# Altium PCB Pod_Islands_Panel.PcbDoc (part 6 of 10)
Units mm, origin at the board's own origin, x right, y up, seen from the top; angles counter-clockwise.
Board outline 95.7 x 83.7 mm, 6 copper layers (Top Layer, Inner1, Inner2, Inner3, Inner4, Bottom Layer), stack 0.82 mm thick; 1100 components, 940 nets, 4944 pads, 3680 vias.
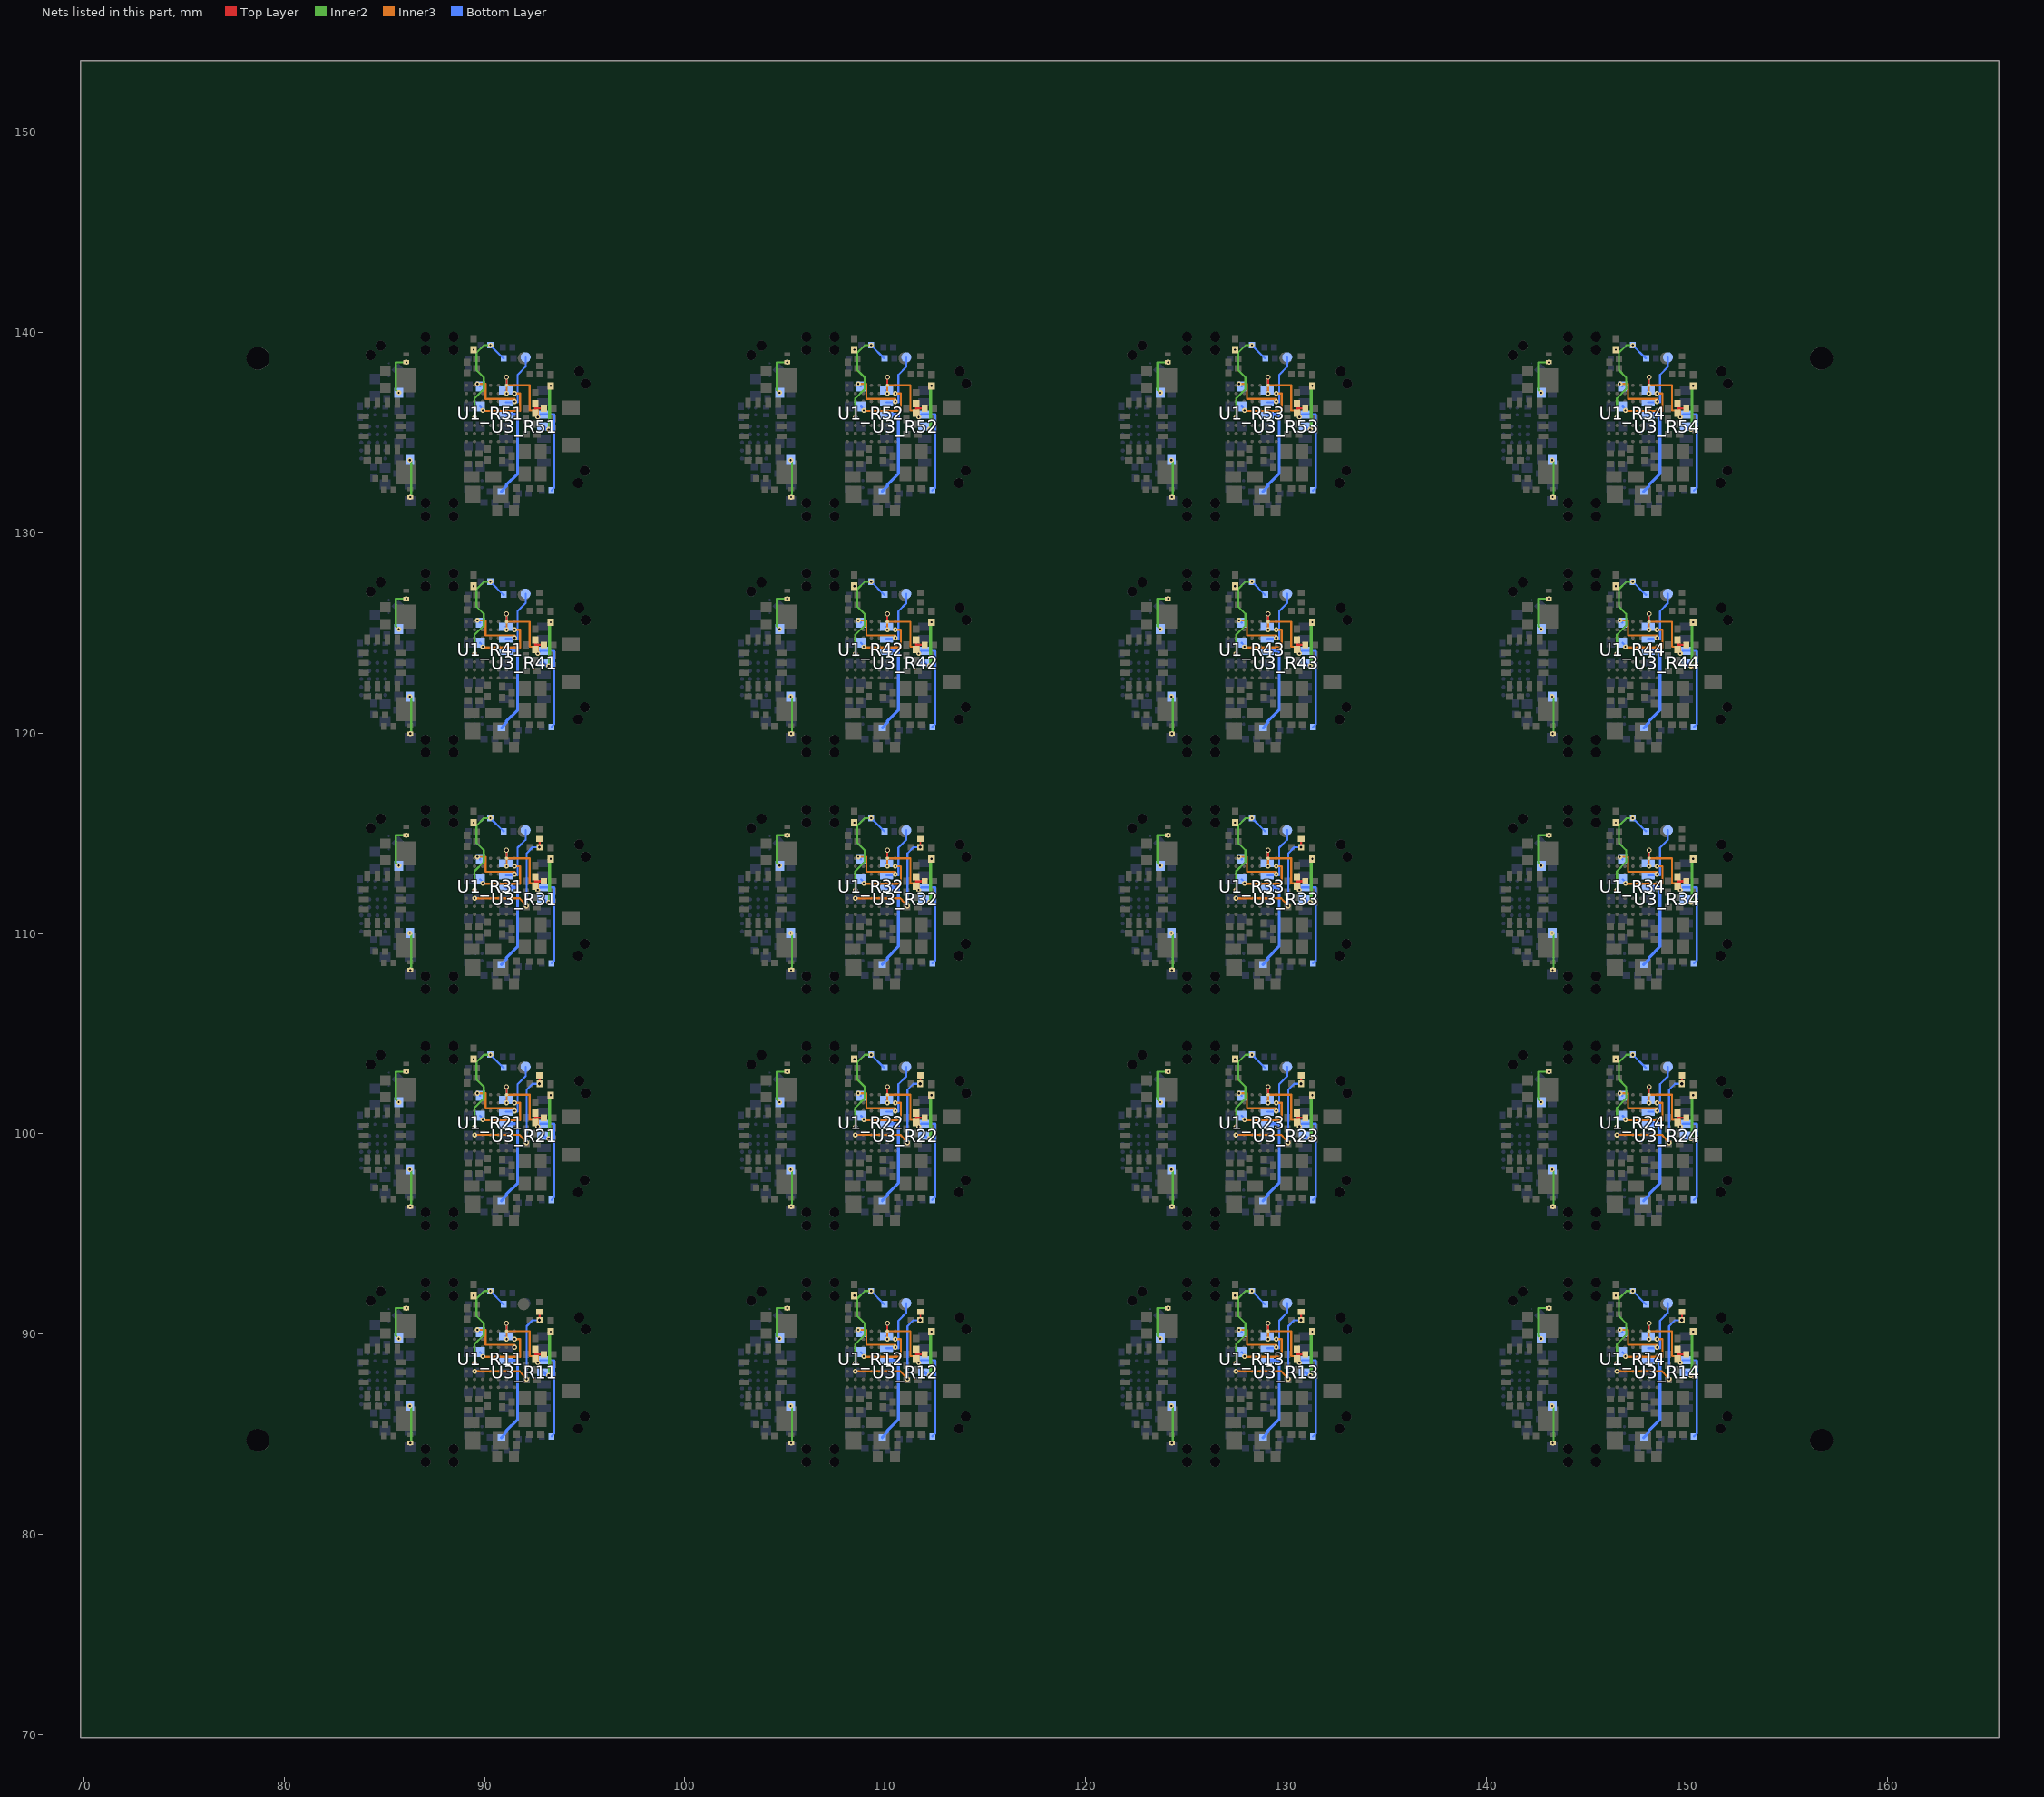
[diagram p10: the nets of this part, all layers, seen from the top]

## Via types
v1: diameter 0.249, hole 0.102, Top Layer to Inner1, 920 vias
v2: diameter 0.249, hole 0.102, Inner1 to Bottom Layer, 740 vias
v3: diameter 0.249, hole 0.102, Top Layer to Inner4, 580 vias
v4: diameter 0.249, hole 0.152, Top Layer to Bottom Layer, 540 vias
v5: diameter 0.249, hole 0.102, Inner4 to Bottom Layer, 520 vias
v6: diameter 0.3, hole 0.152, Inner1 to Inner4, 380 vias

## Nets (pads, with @x,y where several pads share a name; then routed paths per layer and width w, separated by ;. In a path a pad name is that pad's centre, name@x,y a point inside that pad or via, vN(x,y) a via of type N, cw(c..) or ccw(c..) an arc to the next point about the centre after c; other vN are vias at no path point) (continued)
PPG_GPIO_R12: pad.TP2@111.049,91.551 U3_R12.13 | length 3
  Bottom Layer w0.1: U3_R12.13@110.06,89.301 110.65,89.301 110.65,90.676 111.05,91.076 pad.TP2@111.05,91.551
PPG_GPIO_R13: pad.TP2@130.051,91.551 U3_R13.13 | length 3
  Bottom Layer w0.1: U3_R13.13@129.06,89.301 129.65,89.301 129.65,90.676 130.05,91.076 pad.TP2@130.051,91.551
PPG_GPIO_R14: pad.TP2@149.05,91.551 U3_R14.13 | length 3
  Bottom Layer w0.1: U3_R14.13@148.06,89.301 148.65,89.301 148.65,90.676 149.05,91.076 pad.TP2@149.05,91.551
PPG_GPIO_R21: pad.TP2@92.05,103.352 U3_R21.13 | length 3
  Bottom Layer w0.1: U3_R21.13@91.06,101.1 91.65,101.101 91.65,102.476 92.05,102.876 pad.TP2@92.05,103.351
PPG_GPIO_R22: pad.TP2@111.049,103.352 U3_R22.13 | length 3
  Bottom Layer w0.1: U3_R22.13@110.06,101.1 110.65,101.101 110.65,102.476 111.05,102.876 pad.TP2@111.05,103.351
PPG_GPIO_R23: pad.TP2@130.051,103.352 U3_R23.13 | length 3
  Bottom Layer w0.1: U3_R23.13@129.06,101.1 129.65,101.101 129.65,102.476 130.05,102.876 pad.TP2@130.05,103.351
PPG_GPIO_R24: pad.TP2@149.05,103.352 U3_R24.13 | length 3
  Bottom Layer w0.1: U3_R24.13@148.06,101.1 148.65,101.101 148.65,102.476 149.05,102.876 pad.TP2@149.05,103.351
PPG_GPIO_R31: pad.TP2@92.05,115.15 U3_R31.13 | length 3
  Bottom Layer w0.1: U3_R31.13@91.06,112.9 91.65,112.901 91.65,114.276 92.05,114.676 pad.TP2@92.05,115.15
PPG_GPIO_R32: pad.TP2@111.049,115.15 U3_R32.13 | length 3
  Bottom Layer w0.1: U3_R32.13@110.06,112.9 110.65,112.901 110.65,114.276 111.05,114.676 pad.TP2@111.05,115.151
PPG_GPIO_R33: pad.TP2@130.051,115.15 U3_R33.13 | length 3
  Bottom Layer w0.1: U3_R33.13@129.06,112.9 129.65,112.901 129.65,114.276 130.05,114.676 pad.TP2@130.051,115.15
PPG_GPIO_R34: pad.TP2@149.05,115.15 U3_R34.13 | length 3
  Bottom Layer w0.1: U3_R34.13@148.06,112.9 148.65,112.901 148.65,114.276 149.05,114.676 pad.TP2@149.05,115.15
PPG_GPIO_R41: pad.TP2@92.05,126.951 U3_R41.13 | length 3
  Bottom Layer w0.1: U3_R41.13@91.06,124.701 91.65,124.701 91.65,126.076 92.05,126.476 pad.TP2@92.05,126.951
PPG_GPIO_R42: pad.TP2@111.049,126.951 U3_R42.13 | length 3
  Bottom Layer w0.1: U3_R42.13@110.06,124.701 110.65,124.701 110.65,126.076 111.05,126.476 pad.TP2@111.05,126.951
PPG_GPIO_R43: pad.TP2@130.051,126.951 U3_R43.13 | length 3
  Bottom Layer w0.1: U3_R43.13@129.06,124.701 129.65,124.701 129.65,126.076 130.05,126.476 pad.TP2@130.051,126.951
PPG_GPIO_R44: pad.TP2@149.05,126.951 U3_R44.13 | length 3
  Bottom Layer w0.1: U3_R44.13@148.06,124.701 148.65,124.701 148.65,126.076 149.05,126.476 pad.TP2@149.05,126.951
PPG_GPIO_R51: pad.TP2@92.05,138.752 U3_R51.13 | length 3
  Bottom Layer w0.1: U3_R51.13@91.06,136.5 91.65,136.501 91.65,137.876 92.05,138.276 pad.TP2@92.05,138.751
PPG_GPIO_R52: pad.TP2@111.049,138.752 U3_R52.13 | length 3
  Bottom Layer w0.1: U3_R52.13@110.06,136.5 110.65,136.501 110.65,137.876 111.05,138.276 pad.TP2@111.05,138.751
PPG_GPIO_R53: pad.TP2@130.051,138.752 U3_R53.13 | length 3
  Bottom Layer w0.1: U3_R53.13@129.06,136.5 129.65,136.501 129.65,137.876 130.05,138.276 pad.TP2@130.05,138.751
PPG_GPIO_R54: pad.TP2@149.05,138.752 U3_R54.13 | length 3
  Bottom Layer w0.1: U3_R54.13@148.06,136.5 148.65,136.501 148.65,137.876 149.05,138.276 pad.TP2@149.05,138.751
PPG_INT_R11: U1_R11.H2 U3_R11.14 | length 1.1
  Top Layer w0.1: U1_R11.H2@91.1,90.15 v4(91.1,90.55)
  Bottom Layer w0.1: U3_R11.14@91.06,89.9 91.1,89.941 v4(91.1,90.55)
PPG_INT_R12: U1_R12.H2 U3_R12.14 | length 1.1
  Top Layer w0.1: U1_R12.H2@110.1,90.15 v4(110.1,90.55)
  Bottom Layer w0.1: U3_R12.14@110.06,89.9 110.1,89.941 v4(110.1,90.55)
PPG_INT_R13: U1_R13.H2 U3_R13.14 | length 1.1
  Top Layer w0.1: U1_R13.H2@129.1,90.15 v4(129.1,90.55)
  Bottom Layer w0.1: U3_R13.14@129.06,89.9 129.1,89.941 v4(129.1,90.55)
PPG_INT_R14: U1_R14.H2 U3_R14.14 | length 1.1
  Top Layer w0.1: U1_R14.H2@148.1,90.15 v4(148.1,90.55)
  Bottom Layer w0.1: U3_R14.14@148.06,89.9 148.1,89.941 v4(148.1,90.55)
PPG_INT_R21: U1_R21.H2 U3_R21.14 | length 1.1
  Top Layer w0.1: U1_R21.H2@91.1,101.949 v4(91.1,102.35)
  Bottom Layer w0.1: U3_R21.14@91.06,101.7 91.1,101.741 v4(91.1,102.35)
PPG_INT_R22: U1_R22.H2 U3_R22.14 | length 1.1
  Top Layer w0.1: U1_R22.H2@110.1,101.949 v4(110.1,102.35)
  Bottom Layer w0.1: U3_R22.14@110.06,101.7 110.1,101.741 v4(110.1,102.35)
PPG_INT_R23: U1_R23.H2 U3_R23.14 | length 1.1
  Top Layer w0.1: U1_R23.H2@129.1,101.949 v4(129.1,102.35)
  Bottom Layer w0.1: U3_R23.14@129.06,101.7 129.1,101.741 v4(129.1,102.35)
PPG_INT_R24: U1_R24.H2 U3_R24.14 | length 1.1
  Top Layer w0.1: U1_R24.H2@148.1,101.949 v4(148.1,102.35)
  Bottom Layer w0.1: U3_R24.14@148.06,101.7 148.1,101.741 v4(148.1,102.35)
PPG_INT_R31: U1_R31.H2 U3_R31.14 | length 1.1
  Top Layer w0.1: U1_R31.H2@91.1,113.75 v4(91.1,114.15)
  Bottom Layer w0.1: U3_R31.14@91.06,113.5 91.1,113.541 v4(91.1,114.15)
PPG_INT_R32: U1_R32.H2 U3_R32.14 | length 1.1
  Top Layer w0.1: U1_R32.H2@110.1,113.75 v4(110.1,114.15)
  Bottom Layer w0.1: U3_R32.14@110.06,113.5 110.1,113.541 v4(110.1,114.15)
PPG_INT_R33: U1_R33.H2 U3_R33.14 | length 1.1
  Top Layer w0.1: U1_R33.H2@129.1,113.75 v4(129.1,114.15)
  Bottom Layer w0.1: U3_R33.14@129.06,113.5 129.1,113.541 v4(129.1,114.15)
PPG_INT_R34: U1_R34.H2 U3_R34.14 | length 1.1
  Top Layer w0.1: U1_R34.H2@148.1,113.75 v4(148.1,114.15)
  Bottom Layer w0.1: U3_R34.14@148.06,113.5 148.1,113.541 v4(148.1,114.15)
PPG_INT_R41: U1_R41.H2 U3_R41.14 | length 1.1
  Top Layer w0.1: U1_R41.H2@91.1,125.55 v4(91.1,125.95)
  Bottom Layer w0.1: U3_R41.14@91.06,125.3 91.1,125.341 v4(91.1,125.95)
PPG_INT_R42: U1_R42.H2 U3_R42.14 | length 1.1
  Top Layer w0.1: U1_R42.H2@110.1,125.55 v4(110.1,125.95)
  Bottom Layer w0.1: U3_R42.14@110.06,125.3 110.1,125.341 v4(110.1,125.95)
PPG_INT_R43: U1_R43.H2 U3_R43.14 | length 1.1
  Top Layer w0.1: U1_R43.H2@129.1,125.55 v4(129.1,125.95)
  Bottom Layer w0.1: U3_R43.14@129.06,125.3 129.1,125.341 v4(129.1,125.95)
PPG_INT_R44: U1_R44.H2 U3_R44.14 | length 1.1
  Top Layer w0.1: U1_R44.H2@148.1,125.55 v4(148.1,125.95)
  Bottom Layer w0.1: U3_R44.14@148.06,125.3 148.1,125.341 v4(148.1,125.95)
PPG_INT_R51: U1_R51.H2 U3_R51.14 | length 1.1
  Top Layer w0.1: U1_R51.H2@91.1,137.349 v4(91.1,137.75)
  Bottom Layer w0.1: U3_R51.14@91.06,137.1 91.1,137.141 v4(91.1,137.75)
PPG_INT_R52: U1_R52.H2 U3_R52.14 | length 1.1
  Top Layer w0.1: U1_R52.H2@110.1,137.349 v4(110.1,137.75)
  Bottom Layer w0.1: U3_R52.14@110.06,137.1 110.1,137.141 v4(110.1,137.75)
PPG_INT_R53: U1_R53.H2 U3_R53.14 | length 1.1
  Top Layer w0.1: U1_R53.H2@129.1,137.349 v4(129.1,137.75)
  Bottom Layer w0.1: U3_R53.14@129.06,137.1 129.1,137.141 v4(129.1,137.75)
PPG_INT_R54: U1_R54.H2 U3_R54.14 | length 1.1
  Top Layer w0.1: U1_R54.H2@148.1,137.349 v4(148.1,137.75)
  Bottom Layer w0.1: U3_R54.14@148.06,137.1 148.1,137.141 v4(148.1,137.75)
PPG_LDO_EN_R11: R5_R11.1 U1_R11.G2 U3_R11.3 | length 8.3
  Inner3 w0.1: v3(91.1,89.75) 91.1,90.15 92.25,90.15 92.25,88.9 92.66,88.9 v2(92.66,88.57)
  Bottom Layer w0.1: v2(92.66,88.57) 92.791,88.701 92.959,88.701 93.48,88.701 93.48,85.041 R5_R11.1@93.34,84.901
PPG_LDO_EN_R12: R5_R12.1 U1_R12.G2 U3_R12.3 | length 8.3
  Inner3 w0.1: v3@110.1,89.75 110.1,90.15 111.25,90.15 111.25,88.9 111.66,88.9 v2(111.66,88.57)
  Bottom Layer w0.1: v2(111.66,88.57) 111.791,88.701 111.959,88.701 112.48,88.701 112.48,85.041 R5_R12.1@112.34,84.901
  other v3: 110.1,89.75
PPG_LDO_EN_R13: R5_R13.1 U1_R13.G2 U3_R13.3 | length 8.3
  Inner3 w0.1: v3(129.1,89.75) 129.1,90.15 130.25,90.15 130.25,88.9 130.66,88.9 v2(130.66,88.57)
  Bottom Layer w0.1: v2(130.66,88.57) 130.791,88.701 130.959,88.701 131.48,88.701 131.48,85.041 R5_R13.1@131.34,84.901
PPG_LDO_EN_R14: R5_R14.1 U1_R14.G2 U3_R14.3 | length 8.3
  Inner3 w0.1: v3(148.1,89.75) 148.1,90.15 149.25,90.15 149.25,88.9 149.66,88.9 v2(149.66,88.57)
  Bottom Layer w0.1: v2(149.66,88.57) 149.791,88.701 149.959,88.701 150.48,88.701 150.48,85.041 R5_R14.1@150.34,84.901
PPG_LDO_EN_R21: R5_R21.1 U1_R21.G2 U3_R21.3 | length 8.3
  Inner3 w0.1: v3(91.1,101.55) 91.1,101.95 92.25,101.95 92.25,100.7 92.66,100.7 v2(92.66,100.37)
  Bottom Layer w0.1: v2(92.66,100.37) 92.791,100.501 U3_R21.3@92.96,100.5 93.48,100.501 93.48,96.841 R5_R21.1@93.34,96.701
PPG_LDO_EN_R22: R5_R22.1 U1_R22.G2 U3_R22.3 | length 8.3
  Inner3 w0.1: v3@110.1,101.55 110.1,101.95 111.25,101.95 111.25,100.7 111.66,100.7 v2(111.66,100.37)
  Bottom Layer w0.1: v2(111.66,100.37) 111.791,100.501 U3_R22.3@111.96,100.5 112.48,100.501 112.48,96.841 R5_R22.1@112.342,96.7
  other v3: 110.1,101.55
PPG_LDO_EN_R23: R5_R23.1 U1_R23.G2 U3_R23.3 | length 8.3
  Inner3 w0.1: v3(129.1,101.55) 129.1,101.95 130.25,101.95 130.25,100.7 130.66,100.7 v2(130.66,100.37)
  Bottom Layer w0.1: v2(130.66,100.37) 130.791,100.501 U3_R23.3@130.96,100.5 131.48,100.501 131.48,96.841 R5_R23.1@131.342,96.7
PPG_LDO_EN_R24: R5_R24.1 U1_R24.G2 U3_R24.3 | length 8.3
  Inner3 w0.1: v3(148.1,101.55) 148.1,101.95 149.25,101.95 149.25,100.7 149.66,100.7 v2(149.66,100.37)
  Bottom Layer w0.1: v2(149.66,100.37) 149.791,100.501 U3_R24.3@149.96,100.5 150.48,100.501 150.48,96.841 R5_R24.1@150.34,96.701
PPG_LDO_EN_R31: R5_R31.1 U1_R31.G2 U3_R31.3 | length 8.3
  Inner3 w0.1: v3(91.1,113.35) 91.1,113.75 92.25,113.75 92.25,112.5 92.66,112.5 v2(92.66,112.17)
  Bottom Layer w0.1: v2(92.66,112.17) 92.791,112.301 U3_R31.3@92.96,112.3 93.48,112.301 93.48,108.641 R5_R31.1@93.34,108.501
PPG_LDO_EN_R32: R5_R32.1 U1_R32.G2 U3_R32.3 | length 8.3
  Inner3 w0.1: v3@110.1,113.35 110.1,113.75 111.25,113.75 111.25,112.5 111.66,112.5 v2(111.66,112.17)
  Bottom Layer w0.1: v2(111.66,112.17) 111.791,112.301 U3_R32.3@111.96,112.3 112.48,112.301 112.48,108.641 R5_R32.1@112.342,108.5
  other v3: 110.1,113.35
PPG_LDO_EN_R33: R5_R33.1 U1_R33.G2 U3_R33.3 | length 8.3
  Inner3 w0.1: v3(129.1,113.35) 129.1,113.75 130.25,113.75 130.25,112.5 130.66,112.5 v2(130.66,112.17)
  Bottom Layer w0.1: v2(130.66,112.17) 130.791,112.301 U3_R33.3@130.96,112.3 131.48,112.301 131.48,108.641 R5_R33.1@131.342,108.5
PPG_LDO_EN_R34: R5_R34.1 U1_R34.G2 U3_R34.3 | length 8.3
  Inner3 w0.1: v3(148.1,113.35) 148.1,113.75 149.25,113.75 149.25,112.5 149.66,112.5 v2(149.66,112.17)
  Bottom Layer w0.1: v2(149.66,112.17) 149.791,112.301 U3_R34.3@149.96,112.3 150.48,112.301 150.48,108.641 R5_R34.1@150.34,108.501
PPG_LDO_EN_R41: R5_R41.1 U1_R41.G2 U3_R41.3 | length 8.3
  Inner3 w0.1: v3(91.1,125.15) 91.1,125.55 92.25,125.55 92.25,124.3 92.66,124.3 v2(92.66,123.97)
  Bottom Layer w0.1: v2(92.66,123.97) 92.791,124.101 92.959,124.101 93.48,124.101 93.48,120.441 R5_R41.1@93.34,120.301
PPG_LDO_EN_R42: R5_R42.1 U1_R42.G2 U3_R42.3 | length 8.3
  Inner3 w0.1: v3@110.1,125.15 110.1,125.55 111.25,125.55 111.25,124.3 111.66,124.3 v2(111.66,123.97)
  Bottom Layer w0.1: v2(111.66,123.97) 111.791,124.101 111.959,124.101 112.48,124.101 112.48,120.441 R5_R42.1@112.34,120.301
  other v3: 110.1,125.15
PPG_LDO_EN_R43: R5_R43.1 U1_R43.G2 U3_R43.3 | length 8.3
  Inner3 w0.1: v3(129.1,125.15) 129.1,125.55 130.25,125.55 130.25,124.3 130.66,124.3 v2(130.66,123.97)
  Bottom Layer w0.1: v2(130.66,123.97) 130.791,124.101 130.959,124.101 131.48,124.101 131.48,120.441 R5_R43.1@131.34,120.301
PPG_LDO_EN_R44: R5_R44.1 U1_R44.G2 U3_R44.3 | length 8.3
  Inner3 w0.1: v3(148.1,125.15) 148.1,125.55 149.25,125.55 149.25,124.3 149.66,124.3 v2(149.66,123.97)
  Bottom Layer w0.1: v2(149.66,123.97) 149.791,124.101 149.959,124.101 150.48,124.101 150.48,120.441 R5_R44.1@150.34,120.301
PPG_LDO_EN_R51: R5_R51.1 U1_R51.G2 U3_R51.3 | length 8.3
  Inner3 w0.1: v3(91.1,136.95) 91.1,137.35 92.25,137.35 92.25,136.1 92.66,136.1 v2(92.66,135.77)
  Bottom Layer w0.1: v2(92.66,135.77) 92.791,135.901 U3_R51.3@92.96,135.9 93.48,135.901 93.48,132.241 R5_R51.1@93.34,132.101
PPG_LDO_EN_R52: R5_R52.1 U1_R52.G2 U3_R52.3 | length 8.3
  Inner3 w0.1: v3@110.1,136.95 110.1,137.35 111.25,137.35 111.25,136.1 111.66,136.1 v2(111.66,135.77)
  Bottom Layer w0.1: v2(111.66,135.77) 111.791,135.901 U3_R52.3@111.96,135.9 112.48,135.901 112.48,132.241 R5_R52.1@112.342,132.1
  other v3: 110.1,136.95
PPG_LDO_EN_R53: R5_R53.1 U1_R53.G2 U3_R53.3 | length 8.3
  Inner3 w0.1: v3(129.1,136.95) 129.1,137.35 130.25,137.35 130.25,136.1 130.66,136.1 v2(130.66,135.77)
  Bottom Layer w0.1: v2(130.66,135.77) 130.791,135.901 U3_R53.3@130.96,135.9 131.48,135.901 131.48,132.241 R5_R53.1@131.342,132.1
PPG_LDO_EN_R54: R5_R54.1 U1_R54.G2 U3_R54.3 | length 8.3
  Inner3 w0.1: v3(148.1,136.95) 148.1,137.35 149.25,137.35 149.25,136.1 149.66,136.1 v2(149.66,135.77)
  Bottom Layer w0.1: v2(149.66,135.77) 149.791,135.901 U3_R54.3@149.96,135.9 150.48,135.901 150.48,132.241 R5_R54.1@150.34,132.101
PPG_VLDO_R11: C31_R11.1 U3_R11.4 | length 2.5
  Inner2 w0.15: v2(93.2,87.949) 93.25,87.999 93.25,90.076 v3(93.3,90.126)
  Bottom Layer w0.15: U3_R11.4@92.96,88.1 93.109,87.949 v2(93.2,87.949)
PPG_VLDO_R12: C31_R12.1 U3_R12.4 | length 2.5
  Inner2 w0.15: v2(112.2,87.949) 112.25,87.999 112.25,90.076 v3(112.3,90.126)
  Bottom Layer w0.15: U3_R12.4@111.96,88.1 112.109,87.949 v2(112.2,87.949)
PPG_VLDO_R13: C31_R13.1 U3_R13.4 | length 2.5
  Inner2 w0.15: v2(131.2,87.949) 131.25,87.999 131.25,90.076 v3(131.3,90.126)
  Bottom Layer w0.15: U3_R13.4@130.96,88.1 131.109,87.949 v2(131.2,87.949)
PPG_VLDO_R14: C31_R14.1 U3_R14.4 | length 2.5
  Inner2 w0.15: v2(150.2,87.949) 150.25,87.999 150.25,90.076 v3(150.3,90.126)
  Bottom Layer w0.15: U3_R14.4@149.96,88.1 150.109,87.949 v2(150.2,87.949)
PPG_VLDO_R21: C31_R21.1 U3_R21.4 | length 2.5
  Inner2 w0.15: v2(93.2,99.749) 93.25,99.799 93.25,101.876 v3(93.3,101.926)
  Bottom Layer w0.15: U3_R21.4@92.959,99.899 93.109,99.749 v2(93.2,99.749)
PPG_VLDO_R22: C31_R22.1 U3_R22.4 | length 2.5
  Inner2 w0.15: v2(112.2,99.749) 112.25,99.799 112.25,101.876 v3(112.3,101.926)
  Bottom Layer w0.15: U3_R22.4@111.959,99.899 112.109,99.749 v2(112.2,99.749)
PPG_VLDO_R23: C31_R23.1 U3_R23.4 | length 2.5
  Inner2 w0.15: v2(131.2,99.749) 131.25,99.799 131.25,101.876 v3(131.3,101.926)
  Bottom Layer w0.15: U3_R23.4@130.959,99.899 131.109,99.749 v2(131.2,99.749)
PPG_VLDO_R24: C31_R24.1 U3_R24.4 | length 2.5
  Inner2 w0.15: v2(150.2,99.749) 150.25,99.799 150.25,101.876 v3(150.3,101.926)
  Bottom Layer w0.15: U3_R24.4@149.959,99.899 150.109,99.749 v2(150.2,99.749)
PPG_VLDO_R31: C31_R31.1 U3_R31.4 | length 2.5
  Inner2 w0.15: v2(93.2,111.549) 93.25,111.599 93.25,113.676 v3(93.3,113.726)
  Bottom Layer w0.15: U3_R31.4@92.96,111.7 93.109,111.549 v2(93.2,111.549)
PPG_VLDO_R32: C31_R32.1 U3_R32.4 | length 2.5
  Inner2 w0.15: v2(112.2,111.549) 112.25,111.599 112.25,113.676 v3(112.3,113.726)
  Bottom Layer w0.15: U3_R32.4@111.96,111.7 112.109,111.549 v2(112.2,111.549)
PPG_VLDO_R33: C31_R33.1 U3_R33.4 | length 2.5
  Inner2 w0.15: v2(131.2,111.549) 131.25,111.599 131.25,113.676 v3(131.3,113.726)
  Bottom Layer w0.15: U3_R33.4@130.96,111.7 131.109,111.549 v2(131.2,111.549)
PPG_VLDO_R34: C31_R34.1 U3_R34.4 | length 2.5
  Inner2 w0.15: v2(150.2,111.549) 150.25,111.599 150.25,113.676 v3(150.3,113.726)
  Bottom Layer w0.15: U3_R34.4@149.96,111.7 150.109,111.549 v2(150.2,111.549)
PPG_VLDO_R41: C31_R41.1 U3_R41.4 | length 2.5
  Inner2 w0.15: v2(93.2,123.349) 93.25,123.399 93.25,125.476 v3(93.3,125.526)
  Bottom Layer w0.15: U3_R41.4@92.96,123.5 93.109,123.349 v2(93.2,123.349)
PPG_VLDO_R42: C31_R42.1 U3_R42.4 | length 2.5
  Inner2 w0.15: v2(112.2,123.349) 112.25,123.399 112.25,125.476 v3(112.3,125.526)
  Bottom Layer w0.15: U3_R42.4@111.96,123.5 112.109,123.349 v2(112.2,123.349)
PPG_VLDO_R43: C31_R43.1 U3_R43.4 | length 2.5
  Inner2 w0.15: v2(131.2,123.349) 131.25,123.399 131.25,125.476 v3(131.3,125.526)
  Bottom Layer w0.15: U3_R43.4@130.96,123.5 131.109,123.349 v2(131.2,123.349)
PPG_VLDO_R44: C31_R44.1 U3_R44.4 | length 2.5
  Inner2 w0.15: v2(150.2,123.349) 150.25,123.399 150.25,125.476 v3(150.3,125.526)
  Bottom Layer w0.15: U3_R44.4@149.96,123.5 150.109,123.349 v2(150.2,123.349)
PPG_VLDO_R51: C31_R51.1 U3_R51.4 | length 2.5
  Inner2 w0.15: v2(93.2,135.149) 93.25,135.199 93.25,137.276 v3(93.3,137.326)
  Bottom Layer w0.15: U3_R51.4@92.959,135.299 93.109,135.149 v2(93.2,135.149)
PPG_VLDO_R52: C31_R52.1 U3_R52.4 | length 2.5
  Inner2 w0.15: v2(112.2,135.149) 112.25,135.199 112.25,137.276 v3(112.3,137.326)
  Bottom Layer w0.15: U3_R52.4@111.959,135.299 112.109,135.149 v2(112.2,135.149)
PPG_VLDO_R53: C31_R53.1 U3_R53.4 | length 2.5
  Inner2 w0.15: v2(131.2,135.149) 131.25,135.199 131.25,137.276 v3(131.3,137.326)
  Bottom Layer w0.15: U3_R53.4@130.959,135.299 131.109,135.149 v2(131.2,135.149)
PPG_VLDO_R54: C31_R54.1 U3_R54.4 | length 2.5
  Inner2 w0.15: v2(150.2,135.149) 150.25,135.199 150.25,137.276 v3(150.3,137.326)
  Bottom Layer w0.15: U3_R54.4@149.959,135.299 150.109,135.149 v2(150.2,135.149)
PPG_VREF_R11: C32_R11.1 U3_R11.12 | length 4.8
  Bottom Layer w0.15: C32_R11.1@90.844,84.85 91.1,85.127 91.1,85.2 91.65,85.75 91.65,88.701 U3_R11.12@91.06,88.701
PPG_VREF_R12: C32_R12.1 U3_R12.12 | length 4.8
  Bottom Layer w0.15: C32_R12.1@109.843,84.85 110.1,85.127 110.1,85.2 110.65,85.75 110.65,88.701 U3_R12.12@110.06,88.701
PPG_VREF_R13: C32_R13.1 U3_R13.12 | length 4.8
  Bottom Layer w0.15: C32_R13.1@128.844,84.85 129.1,85.127 129.1,85.2 129.65,85.75 129.65,88.701 U3_R13.12@129.06,88.701
PPG_VREF_R14: C32_R14.1 U3_R14.12 | length 4.8
  Bottom Layer w0.15: C32_R14.1@147.844,84.85 148.1,85.127 148.1,85.2 148.65,85.75 148.65,88.701 U3_R14.12@148.06,88.701
PPG_VREF_R21: C32_R21.1 U3_R21.12 | length 4.8
  Bottom Layer w0.15: C32_R21.1@90.844,96.65 91.1,96.927 91.1,97 91.65,97.55 91.65,100.501 U3_R21.12@91.06,100.5
PPG_VREF_R22: C32_R22.1 U3_R22.12 | length 4.8
  Bottom Layer w0.15: C32_R22.1@109.843,96.65 110.1,96.927 110.1,97 110.65,97.55 110.65,100.501 U3_R22.12@110.06,100.5
PPG_VREF_R23: C32_R23.1 U3_R23.12 | length 4.8
  Bottom Layer w0.15: C32_R23.1@128.844,96.65 129.1,96.927 129.1,97 129.65,97.55 129.65,100.501 U3_R23.12@129.06,100.5
PPG_VREF_R24: C32_R24.1 U3_R24.12 | length 4.8
  Bottom Layer w0.15: C32_R24.1@147.844,96.65 148.1,96.927 148.1,97 148.65,97.55 148.65,100.501 U3_R24.12@148.06,100.5
PPG_VREF_R31: C32_R31.1 U3_R31.12 | length 4.8
  Bottom Layer w0.15: C32_R31.1@90.844,108.45 91.1,108.727 91.1,108.8 91.65,109.35 91.65,112.301 U3_R31.12@91.06,112.3
PPG_VREF_R32: C32_R32.1 U3_R32.12 | length 4.8
  Bottom Layer w0.15: C32_R32.1@109.843,108.45 110.1,108.727 110.1,108.8 110.65,109.35 110.65,112.301 U3_R32.12@110.06,112.3
PPG_VREF_R33: C32_R33.1 U3_R33.12 | length 4.8
  Bottom Layer w0.15: C32_R33.1@128.844,108.45 129.1,108.727 129.1,108.8 129.65,109.35 129.65,112.301 U3_R33.12@129.06,112.3
PPG_VREF_R34: C32_R34.1 U3_R34.12 | length 4.8
  Bottom Layer w0.15: C32_R34.1@147.844,108.45 148.1,108.727 148.1,108.8 148.65,109.35 148.65,112.301 U3_R34.12@148.06,112.3
PPG_VREF_R41: C32_R41.1 U3_R41.12 | length 4.8
  Bottom Layer w0.15: C32_R41.1@90.844,120.25 91.1,120.527 91.1,120.6 91.65,121.15 91.65,124.101 U3_R41.12@91.06,124.101
PPG_VREF_R42: C32_R42.1 U3_R42.12 | length 4.8
  Bottom Layer w0.15: C32_R42.1@109.843,120.25 110.1,120.527 110.1,120.6 110.65,121.15 110.65,124.101 U3_R42.12@110.06,124.101
PPG_VREF_R43: C32_R43.1 U3_R43.12 | length 4.8
  Bottom Layer w0.15: C32_R43.1@128.844,120.25 129.1,120.527 129.1,120.6 129.65,121.15 129.65,124.101 U3_R43.12@129.06,124.101
PPG_VREF_R44: C32_R44.1 U3_R44.12 | length 4.8
  Bottom Layer w0.15: C32_R44.1@147.844,120.25 148.1,120.527 148.1,120.6 148.65,121.15 148.65,124.101 U3_R44.12@148.06,124.101
PPG_VREF_R51: C32_R51.1 U3_R51.12 | length 4.8
  Bottom Layer w0.15: C32_R51.1@90.844,132.05 91.1,132.327 91.1,132.4 91.65,132.95 91.65,135.901 U3_R51.12@91.06,135.9
PPG_VREF_R52: C32_R52.1 U3_R52.12 | length 4.8
  Bottom Layer w0.15: C32_R52.1@109.843,132.05 110.1,132.327 110.1,132.4 110.65,132.95 110.65,135.901 U3_R52.12@110.06,135.9
PPG_VREF_R53: C32_R53.1 U3_R53.12 | length 4.8
  Bottom Layer w0.15: C32_R53.1@128.844,132.05 129.1,132.327 129.1,132.4 129.65,132.95 129.65,135.901 U3_R53.12@129.06,135.9
PPG_VREF_R54: C32_R54.1 U3_R54.12 | length 4.8
  Bottom Layer w0.15: C32_R54.1@147.844,132.05 148.1,132.327 148.1,132.4 148.65,132.95 148.65,135.901 U3_R54.12@148.06,135.9
RF_50R_R11: C42_R11.1 L3_R11.2 Z41_R11.1 | length 0.9
  Top Layer w0.124: L3_R11.2@92.53,88.762 92.53,89.001 ; C42_R11.1@92.53,89.237 92.53,89.001 ; Z41_R11.1@92.959,89.001 92.53,89.001
RF_50R_R12: C42_R12.1 L3_R12.2 Z41_R12.1 | length 0.9
  Top Layer w0.124: L3_R12.2@111.53,88.762 111.53,89.001 ; C42_R12.1@111.53,89.237 111.53,89.001 ; Z41_R12.1@111.959,89.001 111.53,89.001
RF_50R_R13: C42_R13.1 L3_R13.2 Z41_R13.1 | length 0.9
  Top Layer w0.124: L3_R13.2@130.53,88.762 130.53,89.001 ; C42_R13.1@130.53,89.237 130.53,89.001 ; Z41_R13.1@130.959,89.001 130.53,89.001
RF_50R_R14: C42_R14.1 L3_R14.2 Z41_R14.1 | length 0.9
  Top Layer w0.124: L3_R14.2@149.53,88.762 149.53,89.001 ; C42_R14.1@149.53,89.237 149.53,89.001 ; Z41_R14.1@149.959,89.001 149.53,89.001
RF_50R_R21: C42_R21.1 L3_R21.2 Z41_R21.1 | length 0.9
  Top Layer w0.124: L3_R21.2@92.53,100.562 92.53,100.801 ; C42_R21.1@92.53,101.037 92.53,100.801 ; Z41_R21.1@92.958,100.8 92.53,100.801
RF_50R_R22: C42_R22.1 L3_R22.2 Z41_R22.1 | length 0.9
  Top Layer w0.124: L3_R22.2@111.53,100.562 111.53,100.801 ; C42_R22.1@111.53,101.037 111.53,100.801 ; Z41_R22.1@111.959,100.801 111.53,100.801
RF_50R_R23: C42_R23.1 L3_R23.2 Z41_R23.1 | length 0.9
  Top Layer w0.124: L3_R23.2@130.53,100.562 130.53,100.801 ; C42_R23.1@130.53,101.037 130.53,100.801 ; Z41_R23.1@130.959,100.801 130.53,100.801
RF_50R_R24: C42_R24.1 L3_R24.2 Z41_R24.1 | length 0.9
  Top Layer w0.124: L3_R24.2@149.53,100.562 149.53,100.801 ; C42_R24.1@149.53,101.037 149.53,100.801 ; Z41_R24.1@149.958,100.8 149.53,100.801
RF_50R_R31: C42_R31.1 L3_R31.2 Z41_R31.1 | length 0.9
  Top Layer w0.124: L3_R31.2@92.53,112.362 92.53,112.601 ; C42_R31.1@92.53,112.837 92.53,112.601 ; Z41_R31.1@92.958,112.6 92.53,112.601
RF_50R_R32: C42_R32.1 L3_R32.2 Z41_R32.1 | length 0.9
  Top Layer w0.124: L3_R32.2@111.53,112.362 111.53,112.601 ; C42_R32.1@111.53,112.837 111.53,112.601 ; Z41_R32.1@111.959,112.601 111.53,112.601
RF_50R_R33: C42_R33.1 L3_R33.2 Z41_R33.1 | length 0.9
  Top Layer w0.124: L3_R33.2@130.53,112.362 130.53,112.601 ; C42_R33.1@130.53,112.837 130.53,112.601 ; Z41_R33.1@130.959,112.601 130.53,112.601
RF_50R_R34: C42_R34.1 L3_R34.2 Z41_R34.1 | length 0.9
  Top Layer w0.124: L3_R34.2@149.53,112.362 149.53,112.601 ; C42_R34.1@149.53,112.837 149.53,112.601 ; Z41_R34.1@149.958,112.6 149.53,112.601
RF_50R_R41: C42_R41.1 L3_R41.2 Z41_R41.1 | length 0.9
  Top Layer w0.124: L3_R41.2@92.53,124.162 92.53,124.401 ; C42_R41.1@92.53,124.637 92.53,124.401 ; Z41_R41.1@92.959,124.401 92.53,124.401
RF_50R_R42: C42_R42.1 L3_R42.2 Z41_R42.1 | length 0.9
  Top Layer w0.124: L3_R42.2@111.53,124.162 111.53,124.401 ; C42_R42.1@111.53,124.637 111.53,124.401 ; Z41_R42.1@111.959,124.401 111.53,124.401
RF_50R_R43: C42_R43.1 L3_R43.2 Z41_R43.1 | length 0.9
  Top Layer w0.124: L3_R43.2@130.53,124.162 130.53,124.401 ; C42_R43.1@130.53,124.637 130.53,124.401 ; Z41_R43.1@130.959,124.401 130.53,124.401
RF_50R_R44: C42_R44.1 L3_R44.2 Z41_R44.1 | length 0.9
  Top Layer w0.124: L3_R44.2@149.53,124.162 149.53,124.401 ; C42_R44.1@149.53,124.637 149.53,124.401 ; Z41_R44.1@149.959,124.401 149.53,124.401
RF_50R_R51: C42_R51.1 L3_R51.2 Z41_R51.1 | length 0.9
  Top Layer w0.124: L3_R51.2@92.53,135.962 92.53,136.201 ; C42_R51.1@92.53,136.437 92.53,136.201 ; Z41_R51.1@92.958,136.2 92.53,136.201
RF_50R_R52: C42_R52.1 L3_R52.2 Z41_R52.1 | length 0.9
  Top Layer w0.124: L3_R52.2@111.53,135.962 111.53,136.201 ; C42_R52.1@111.53,136.437 111.53,136.201 ; Z41_R52.1@111.959,136.201 111.53,136.201
RF_50R_R53: C42_R53.1 L3_R53.2 Z41_R53.1 | length 0.9
  Top Layer w0.124: L3_R53.2@130.53,135.962 130.53,136.201 ; C42_R53.1@130.53,136.437 130.53,136.201 ; Z41_R53.1@130.959,136.201 130.53,136.201
RF_50R_R54: C42_R54.1 L3_R54.2 Z41_R54.1 | length 0.9
  Top Layer w0.124: L3_R54.2@149.53,135.962 149.53,136.201 ; C42_R54.1@149.53,136.437 149.53,136.201 ; Z41_R54.1@149.958,136.2 149.53,136.201
SWDCLK_P11: D13_P11.1 pad.JP10@85.723,89.781 | length 2.1
  Inner2 w0.1: v2(85.724,89.781) 85.575,89.929 85.575,91.3 v3(86.1,91.3)
SWDCLK_P12: D13_P12.1 pad.JP10@104.725,89.781 | length 2.1
  Inner2 w0.1: v2(104.724,89.781) 104.575,89.929 104.575,91.3 v3(105.1,91.3)
SWDCLK_P13: D13_P13.1 pad.JP10@123.724,89.781 | length 2.1
  Inner2 w0.1: v2(123.724,89.781) 123.575,89.929 123.575,91.3 v3(124.1,91.3)
SWDCLK_P14: D13_P14.1 pad.JP10@142.723,89.781 | length 2.1
  Inner2 w0.1: v2(142.724,89.781) 142.575,89.929 142.575,91.3 v3(143.1,91.3)
SWDCLK_P21: D13_P21.1 pad.JP10@85.723,101.581 | length 2.1
  Inner2 w0.1: v2(85.724,101.581) 85.575,101.729 85.575,103.1 v3(86.1,103.1)
SWDCLK_P22: D13_P22.1 pad.JP10@104.725,101.581 | length 2.1
  Inner2 w0.1: v2(104.724,101.581) 104.575,101.729 104.575,103.1 v3(105.1,103.1)
SWDCLK_P23: D13_P23.1 pad.JP10@123.724,101.581 | length 2.1
  Inner2 w0.1: v2(123.724,101.581) 123.575,101.729 123.575,103.1 v3(124.1,103.1)
SWDCLK_P24: D13_P24.1 pad.JP10@142.723,101.581 | length 2.1
  Inner2 w0.1: v2(142.724,101.581) 142.575,101.729 142.575,103.1 v3(143.1,103.1)
SWDCLK_P31: D13_P31.1 pad.JP10@85.723,113.38 | length 2.1
  Inner2 w0.1: v2(85.724,113.381) 85.575,113.529 85.575,114.9 v3(86.1,114.9)
SWDCLK_P32: D13_P32.1 pad.JP10@104.725,113.38 | length 2.1
  Inner2 w0.1: v2(104.724,113.381) 104.575,113.529 104.575,114.9 v3(105.1,114.9)
SWDCLK_P33: D13_P33.1 pad.JP10@123.724,113.38 | length 2.1
  Inner2 w0.1: v2(123.724,113.381) 123.575,113.529 123.575,114.9 v3(124.1,114.9)
SWDCLK_P34: D13_P34.1 pad.JP10@142.723,113.38 | length 2.1
  Inner2 w0.1: v2(142.724,113.381) 142.575,113.529 142.575,114.9 v3(143.1,114.9)
SWDCLK_P41: D13_P41.1 pad.JP10@85.723,125.181 | length 2.1
  Inner2 w0.1: v2(85.724,125.181) 85.575,125.329 85.575,126.7 v3(86.1,126.7)
SWDCLK_P42: D13_P42.1 pad.JP10@104.725,125.181 | length 2.1
  Inner2 w0.1: v2(104.724,125.181) 104.575,125.329 104.575,126.7 v3(105.1,126.7)
SWDCLK_P43: D13_P43.1 pad.JP10@123.724,125.181 | length 2.1
  Inner2 w0.1: v2(123.724,125.181) 123.575,125.329 123.575,126.7 v3(124.1,126.7)
SWDCLK_P44: D13_P44.1 pad.JP10@142.723,125.181 | length 2.1
  Inner2 w0.1: v2(142.724,125.181) 142.575,125.329 142.575,126.7 v3(143.1,126.7)
SWDCLK_P51: D13_P51.1 pad.JP10@85.723,136.981 | length 2.1
  Inner2 w0.1: v2(85.724,136.981) 85.575,137.129 85.575,138.5 v3(86.1,138.5)
SWDCLK_P52: D13_P52.1 pad.JP10@104.725,136.981 | length 2.1
  Inner2 w0.1: v2(104.724,136.981) 104.575,137.129 104.575,138.5 v3(105.1,138.5)
SWDCLK_P53: D13_P53.1 pad.JP10@123.724,136.981 | length 2.1
  Inner2 w0.1: v2(123.724,136.981) 123.575,137.129 123.575,138.5 v3(124.1,138.5)
SWDCLK_P54: D13_P54.1 pad.JP10@142.723,136.981 | length 2.1
  Inner2 w0.1: v2(142.724,136.981) 142.575,137.129 142.575,138.5 v3(143.1,138.5)
SWDCLK_R11: pad.JR10@89.784,90.101 U1_R11.F1 | length 2.9
  Inner3 w0.1: v2(89.65,90.22) 90.05,90.22 90.05,89.475 91.499,89.475 v3(91.499,89.349)
  Bottom Layer w0.1: v2(89.65,90.22) 89.665,90.22 pad.JR10@89.784,90.101
SWDCLK_R12: pad.JR10@108.784,90.101 U1_R12.F1 | length 2.9
  Inner3 w0.1: v2(108.65,90.22) 109.05,90.22 109.05,89.475 110.499,89.475 v3(110.499,89.349)
  Bottom Layer w0.1: v2(108.65,90.22) 108.665,90.22 pad.JR10@108.784,90.101
SWDCLK_R13: pad.JR10@127.785,90.101 U1_R13.F1 | length 2.9
  Inner3 w0.1: v2(127.65,90.22) 128.05,90.22 128.05,89.475 129.499,89.475 v3(129.499,89.349)
  Bottom Layer w0.1: v2(127.65,90.22) 127.665,90.22 pad.JR10@127.785,90.101
SWDCLK_R14: pad.JR10@146.785,90.101 U1_R14.F1 | length 2.9
  Inner3 w0.1: v2(146.65,90.22) 147.05,90.22 147.05,89.475 148.499,89.475 v3(148.499,89.349)
  Bottom Layer w0.1: v2(146.65,90.22) 146.665,90.22 pad.JR10@146.785,90.101
SWDCLK_R21: pad.JR10@89.784,101.901 U1_R21.F1 | length 2.9
  Inner3 w0.1: v2(89.65,102.02) 90.05,102.02 90.05,101.275 91.499,101.275 v3(91.499,101.149)
  Bottom Layer w0.1: v2(89.65,102.02) 89.665,102.02 pad.JR10@89.784,101.901
SWDCLK_R22: pad.JR10@108.784,101.901 U1_R22.F1 | length 2.9
  Inner3 w0.1: v2(108.65,102.02) 109.05,102.02 109.05,101.275 110.499,101.275 v3(110.499,101.149)
  Bottom Layer w0.1: v2(108.65,102.02) 108.665,102.02 pad.JR10@108.784,101.901
SWDCLK_R23: pad.JR10@127.785,101.901 U1_R23.F1 | length 2.9
  Inner3 w0.1: v2(127.65,102.02) 128.05,102.02 128.05,101.275 129.499,101.275 v3(129.499,101.149)
  Bottom Layer w0.1: v2(127.65,102.02) 127.665,102.02 pad.JR10@127.784,101.901
SWDCLK_R24: pad.JR10@146.785,101.901 U1_R24.F1 | length 2.9
  Inner3 w0.1: v2(146.65,102.02) 147.05,102.02 147.05,101.275 148.499,101.275 v3(148.499,101.149)
  Bottom Layer w0.1: v2(146.65,102.02) 146.665,102.02 pad.JR10@146.784,101.901
SWDCLK_R31: pad.JR10@89.784,113.7 U1_R31.F1 | length 2.9
  Inner3 w0.1: v2(89.65,113.82) 90.05,113.82 90.05,113.075 91.499,113.075 v3(91.499,112.949)
  Bottom Layer w0.1: v2(89.65,113.82) 89.665,113.82 pad.JR10@89.784,113.7
SWDCLK_R32: pad.JR10@108.784,113.7 U1_R32.F1 | length 2.9
  Inner3 w0.1: v2(108.65,113.82) 109.05,113.82 109.05,113.075 110.499,113.075 v3(110.499,112.949)
  Bottom Layer w0.1: v2(108.65,113.82) 108.665,113.82 pad.JR10@108.784,113.701
SWDCLK_R33: pad.JR10@127.785,113.7 U1_R33.F1 | length 2.9
  Inner3 w0.1: v2(127.65,113.82) 128.05,113.82 128.05,113.075 129.499,113.075 v3(129.499,112.949)
  Bottom Layer w0.1: v2(127.65,113.82) 127.665,113.82 pad.JR10@127.785,113.7
SWDCLK_R34: pad.JR10@146.785,113.7 U1_R34.F1 | length 2.9
  Inner3 w0.1: v2(146.65,113.82) 147.05,113.82 147.05,113.075 148.499,113.075 v3(148.499,112.949)
  Bottom Layer w0.1: v2(146.65,113.82) 146.665,113.82 pad.JR10@146.785,113.7
SWDCLK_R41: pad.JR10@89.784,125.501 U1_R41.F1 | length 2.9
  Inner3 w0.1: v2(89.65,125.62) 90.05,125.62 90.05,124.875 91.499,124.875 v3(91.499,124.749)
  Bottom Layer w0.1: v2(89.65,125.62) 89.665,125.62 pad.JR10@89.784,125.501
SWDCLK_R42: pad.JR10@108.784,125.501 U1_R42.F1 | length 2.9
  Inner3 w0.1: v2(108.65,125.62) 109.05,125.62 109.05,124.875 110.499,124.875 v3(110.499,124.749)
  Bottom Layer w0.1: v2(108.65,125.62) 108.665,125.62 pad.JR10@108.784,125.501
SWDCLK_R43: pad.JR10@127.785,125.501 U1_R43.F1 | length 2.9
  Inner3 w0.1: v2(127.65,125.62) 128.05,125.62 128.05,124.875 129.499,124.875 v3(129.499,124.749)
  Bottom Layer w0.1: v2(127.65,125.62) 127.665,125.62 pad.JR10@127.785,125.501
SWDCLK_R44: pad.JR10@146.785,125.501 U1_R44.F1 | length 2.9
  Inner3 w0.1: v2(146.65,125.62) 147.05,125.62 147.05,124.875 148.499,124.875 v3(148.499,124.749)
  Bottom Layer w0.1: v2(146.65,125.62) 146.665,125.62 pad.JR10@146.785,125.501
SWDCLK_R51: pad.JR10@89.784,137.301 U1_R51.F1 | length 2.9
  Inner3 w0.1: v2(89.65,137.42) 90.05,137.42 90.05,136.675 91.499,136.675 v3(91.499,136.549)
  Bottom Layer w0.1: v2(89.65,137.42) 89.665,137.42 pad.JR10@89.784,137.301
SWDCLK_R52: pad.JR10@108.784,137.301 U1_R52.F1 | length 2.9
  Inner3 w0.1: v2(108.65,137.42) 109.05,137.42 109.05,136.675 110.499,136.675 v3(110.499,136.549)
  Bottom Layer w0.1: v2(108.65,137.42) 108.665,137.42 pad.JR10@108.784,137.301
SWDCLK_R53: pad.JR10@127.785,137.301 U1_R53.F1 | length 2.9
  Inner3 w0.1: v2(127.65,137.42) 128.05,137.42 128.05,136.675 129.499,136.675 v3(129.499,136.549)
  Bottom Layer w0.1: v2(127.65,137.42) 127.665,137.42 pad.JR10@127.784,137.301
SWDCLK_R54: pad.JR10@146.785,137.301 U1_R54.F1 | length 2.9
  Inner3 w0.1: v2(146.65,137.42) 147.05,137.42 147.05,136.675 148.499,136.675 v3(148.499,136.549)
  Bottom Layer w0.1: v2(146.65,137.42) 146.665,137.42 pad.JR10@146.784,137.301
SWDIO_P11: D12_P11.1 pad.JP1@86.274,86.42 | length 1.9
  Inner2 w0.1: v2(86.275,86.42) 86.34,86.355 86.34,84.61 v3(86.301,84.571)
SWDIO_P12: D12_P12.1 pad.JP1@105.276,86.42 | length 1.9
  Inner2 w0.1: v2(105.275,86.42) 105.34,86.355 105.34,84.61 v3(105.301,84.571)
SWDIO_P13: D12_P13.1 pad.JP1@124.275,86.42 | length 1.9
  Inner2 w0.1: v2(124.275,86.42) 124.34,86.355 124.34,84.61 v3(124.301,84.571)
SWDIO_P14: D12_P14.1 pad.JP1@143.274,86.42 | length 1.9
  Inner2 w0.1: v2(143.275,86.42) 143.34,86.355 143.34,84.61 v3(143.301,84.571)
SWDIO_P21: D12_P21.1 pad.JP1@86.274,98.221 | length 1.9
  Inner2 w0.1: v2(86.275,98.22) 86.34,98.155 86.34,96.41 v3(86.301,96.371)
SWDIO_P22: D12_P22.1 pad.JP1@105.276,98.221 | length 1.9
  Inner2 w0.1: v2(105.275,98.22) 105.34,98.155 105.34,96.41 v3(105.301,96.371)
SWDIO_P23: D12_P23.1 pad.JP1@124.275,98.221 | length 1.9
  Inner2 w0.1: v2(124.275,98.22) 124.34,98.155 124.34,96.41 v3(124.301,96.371)
SWDIO_P24: D12_P24.1 pad.JP1@143.274,98.221 | length 1.9
  Inner2 w0.1: v2(143.275,98.22) 143.34,98.155 143.34,96.41 v3(143.301,96.371)
SWDIO_P31: D12_P31.1 pad.JP1@86.274,110.019 | length 1.9
  Inner2 w0.1: v2(86.275,110.02) 86.34,109.955 86.34,108.21 v3(86.301,108.171)
SWDIO_P32: D12_P32.1 pad.JP1@105.276,110.019 | length 1.9
  Inner2 w0.1: v2(105.275,110.02) 105.34,109.955 105.34,108.21 v3(105.301,108.171)
SWDIO_P33: D12_P33.1 pad.JP1@124.275,110.019 | length 1.9
  Inner2 w0.1: v2(124.275,110.02) 124.34,109.955 124.34,108.21 v3(124.301,108.171)
SWDIO_P34: D12_P34.1 pad.JP1@143.274,110.019 | length 1.9
  Inner2 w0.1: v2(143.275,110.02) 143.34,109.955 143.34,108.21 v3(143.301,108.171)
SWDIO_P41: D12_P41.1 pad.JP1@86.274,121.82 | length 1.9
  Inner2 w0.1: v2(86.275,121.82) 86.34,121.755 86.34,120.01 v3(86.301,119.971)
SWDIO_P42: D12_P42.1 pad.JP1@105.276,121.82 | length 1.9
  Inner2 w0.1: v2(105.275,121.82) 105.34,121.755 105.34,120.01 v3(105.301,119.971)
SWDIO_P43: D12_P43.1 pad.JP1@124.275,121.82 | length 1.9
  Inner2 w0.1: v2(124.275,121.82) 124.34,121.755 124.34,120.01 v3(124.301,119.971)
SWDIO_P44: D12_P44.1 pad.JP1@143.274,121.82 | length 1.9
  Inner2 w0.1: v2(143.275,121.82) 143.34,121.755 143.34,120.01 v3(143.301,119.971)
SWDIO_P51: D12_P51.1 pad.JP1@86.274,133.621 | length 1.9
  Inner2 w0.1: v2(86.275,133.62) 86.34,133.555 86.34,131.81 v3(86.301,131.771)
SWDIO_P52: D12_P52.1 pad.JP1@105.276,133.621 | length 1.9
  Inner2 w0.1: v2(105.275,133.62) 105.34,133.555 105.34,131.81 v3(105.301,131.771)
SWDIO_P53: D12_P53.1 pad.JP1@124.275,133.621 | length 1.9
  Inner2 w0.1: v2(124.275,133.62) 124.34,133.555 124.34,131.81 v3(124.301,131.771)
SWDIO_P54: D12_P54.1 pad.JP1@143.274,133.621 | length 1.9
  Inner2 w0.1: v2(143.275,133.62) 143.34,133.555 143.34,131.81 v3(143.301,131.771)
SWDIO_R11: pad.JR9@89.784,89.1 U1_R11.G1 | length 3.3
  Inner3 w0.1: v2(89.92,88.9) 89.92,88.875 91.775,88.875 91.775,89.75 v3(91.499,89.75)
  Bottom Layer w0.1: pad.JR9@89.784,89.1 89.92,88.964 v2(89.92,88.9)
SWDIO_R12: pad.JR9@108.784,89.1 U1_R12.G1 | length 3.3
  Inner3 w0.1: v2(108.92,88.9) 108.92,88.875 110.775,88.875 110.775,89.75 v3(110.499,89.75)
  Bottom Layer w0.1: pad.JR9@108.784,89.1 108.92,88.964 v2(108.92,88.9)
SWDIO_R13: pad.JR9@127.785,89.1 U1_R13.G1 | length 3.3
  Inner3 w0.1: v2(127.92,88.9) 127.92,88.875 129.775,88.875 129.775,89.75 v3(129.499,89.75)
  Bottom Layer w0.1: pad.JR9@127.785,89.1 127.92,88.964 v2(127.92,88.9)
SWDIO_R14: pad.JR9@146.785,89.1 U1_R14.G1 | length 3.3
  Inner3 w0.1: v2(146.92,88.9) 146.92,88.875 148.775,88.875 148.775,89.75 v3(148.499,89.75)
  Bottom Layer w0.1: pad.JR9@146.785,89.1 146.92,88.964 v2(146.92,88.9)
SWDIO_R21: pad.JR9@89.784,100.901 U1_R21.G1 | length 3.3
  Inner3 w0.1: v2(89.92,100.7) 89.92,100.675 91.775,100.675 91.775,101.55 v3(91.499,101.55)
  Bottom Layer w0.1: pad.JR9@89.784,100.9 89.92,100.764 v2(89.92,100.7)
SWDIO_R22: pad.JR9@108.784,100.901 U1_R22.G1 | length 3.3
  Inner3 w0.1: v2(108.92,100.7) 108.92,100.675 110.775,100.675 110.775,101.55 v3(110.499,101.55)
  Bottom Layer w0.1: pad.JR9@108.784,100.9 108.92,100.764 v2(108.92,100.7)
SWDIO_R23: pad.JR9@127.785,100.901 U1_R23.G1 | length 3.3
  Inner3 w0.1: v2(127.92,100.7) 127.92,100.675 129.775,100.675 129.775,101.55 v3(129.499,101.55)
  Bottom Layer w0.1: pad.JR9@127.784,100.9 127.92,100.764 v2(127.92,100.7)
SWDIO_R24: pad.JR9@146.785,100.901 U1_R24.G1 | length 3.3
  Inner3 w0.1: v2(146.92,100.7) 146.92,100.675 148.775,100.675 148.775,101.55 v3(148.499,101.55)
  Bottom Layer w0.1: pad.JR9@146.784,100.9 146.92,100.764 v2(146.92,100.7)
SWDIO_R31: pad.JR9@89.784,112.699 U1_R31.G1 | length 3.3
  Inner3 w0.1: v2(89.92,112.5) 89.92,112.475 91.775,112.475 91.775,113.35 v3(91.499,113.35)
  Bottom Layer w0.1: pad.JR9@89.784,112.699 89.92,112.564 v2(89.92,112.5)
SWDIO_R32: pad.JR9@108.784,112.699 U1_R32.G1 | length 3.3
  Inner3 w0.1: v2(108.92,112.5) 108.92,112.475 110.775,112.475 110.775,113.35 v3(110.499,113.35)
  Bottom Layer w0.1: pad.JR9@108.784,112.7 108.92,112.564 v2(108.92,112.5)
SWDIO_R33: pad.JR9@127.785,112.699 U1_R33.G1 | length 3.3
  Inner3 w0.1: v2(127.92,112.5) 127.92,112.475 129.775,112.475 129.775,113.35 v3(129.499,113.35)
  Bottom Layer w0.1: pad.JR9@127.785,112.699 127.92,112.564 v2(127.92,112.5)
SWDIO_R34: pad.JR9@146.785,112.699 U1_R34.G1 | length 3.3
  Inner3 w0.1: v2(146.92,112.5) 146.92,112.475 148.775,112.475 148.775,113.35 v3(148.499,113.35)
  Bottom Layer w0.1: pad.JR9@146.785,112.699 146.92,112.564 v2(146.92,112.5)
SWDIO_R41: pad.JR9@89.784,124.5 U1_R41.G1 | length 3.3
  Inner3 w0.1: v2(89.92,124.3) 89.92,124.275 91.775,124.275 91.775,125.15 v3(91.499,125.15)
  Bottom Layer w0.1: pad.JR9@89.784,124.5 89.92,124.364 v2(89.92,124.3)
SWDIO_R42: pad.JR9@108.784,124.5 U1_R42.G1 | length 3.3
  Inner3 w0.1: v2(108.92,124.3) 108.92,124.275 110.775,124.275 110.775,125.15 v3(110.499,125.15)
  Bottom Layer w0.1: pad.JR9@108.784,124.5 108.92,124.364 v2(108.92,124.3)
SWDIO_R43: pad.JR9@127.785,124.5 U1_R43.G1 | length 3.3
  Inner3 w0.1: v2(127.92,124.3) 127.92,124.275 129.775,124.275 129.775,125.15 v3(129.499,125.15)
  Bottom Layer w0.1: pad.JR9@127.785,124.5 127.92,124.364 v2(127.92,124.3)
SWDIO_R44: pad.JR9@146.785,124.5 U1_R44.G1 | length 3.3
  Inner3 w0.1: v2(146.92,124.3) 146.92,124.275 148.775,124.275 148.775,125.15 v3(148.499,125.15)
  Bottom Layer w0.1: pad.JR9@146.785,124.5 146.92,124.364 v2(146.92,124.3)
SWDIO_R51: pad.JR9@89.784,136.301 U1_R51.G1 | length 3.3
  Inner3 w0.1: v2(89.92,136.1) 89.92,136.075 91.775,136.075 91.775,136.95 v3(91.499,136.95)
  Bottom Layer w0.1: pad.JR9@89.784,136.3 89.92,136.164 v2(89.92,136.1)
SWDIO_R52: pad.JR9@108.784,136.301 U1_R52.G1 | length 3.3
  Inner3 w0.1: v2(108.92,136.1) 108.92,136.075 110.775,136.075 110.775,136.95 v3(110.499,136.95)
  Bottom Layer w0.1: pad.JR9@108.784,136.3 108.92,136.164 v2(108.92,136.1)
SWDIO_R53: pad.JR9@127.785,136.301 U1_R53.G1 | length 3.3
  Inner3 w0.1: v2(127.92,136.1) 127.92,136.075 129.775,136.075 129.775,136.95 v3(129.499,136.95)
  Bottom Layer w0.1: pad.JR9@127.784,136.3 127.92,136.164 v2(127.92,136.1)
SWDIO_R54: pad.JR9@146.785,136.301 U1_R54.G1 | length 3.3
  Inner3 w0.1: v2(146.92,136.1) 146.92,136.075 148.775,136.075 148.775,136.95 v3(148.499,136.95)
  Bottom Layer w0.1: pad.JR9@146.784,136.3 146.92,136.164 v2(146.92,136.1)
TH1_SENSE_R11: C10_R11.1 R10_R11.2 TH1_R11.1 U1_R11.D6 | length 5.6
  Inner2 w0.1: v3(89.449,91.927) 89.596,91.78 89.6,91.78 ; v3(89.5,88.551) 89.5,89.5 89.96,89.96 89.96,90.55 89.6,90.91 89.6,91.78 ; v2(90.292,92.15) 89.97,92.15 89.6,91.78
  Bottom Layer w0.1: v2(90.292,92.15) 90.94,91.5 R10_R11.2@90.958,91.5
TH1_SENSE_R12: C10_R12.1 R10_R12.2 TH1_R12.1 U1_R12.D6 | length 5.6
  Inner2 w0.1: v3(108.449,91.927) 108.596,91.78 108.6,91.78 ; v3@108.5,88.551 108.5,89.5 108.96,89.96 108.96,90.55 108.6,90.91 108.6,91.78 ; v2(109.292,92.15) 108.97,92.15 108.6,91.78
  Bottom Layer w0.1: v2(109.292,92.15) 109.94,91.5 R10_R12.2@109.958,91.5
  other v3: 108.5,88.551
TH1_SENSE_R13: C10_R13.1 R10_R13.2 TH1_R13.1 U1_R13.D6 | length 5.6
  Inner2 w0.1: v3(127.449,91.927) 127.596,91.78 127.6,91.78 ; v3(127.5,88.551) 127.5,89.5 127.96,89.96 127.96,90.55 127.6,90.91 127.6,91.78 ; v2(128.292,92.15) 127.97,92.15 127.6,91.78
  Bottom Layer w0.1: v2(128.292,92.15) 128.94,91.5 R10_R13.2@128.958,91.5
TH1_SENSE_R14: C10_R14.1 R10_R14.2 TH1_R14.1 U1_R14.D6 | length 5.6
  Inner2 w0.1: v3(146.449,91.927) 146.596,91.78 146.6,91.78 ; v3(146.5,88.551) 146.5,89.5 146.96,89.96 146.96,90.55 146.6,90.91 146.6,91.78 ; v2(147.292,92.15) 146.97,92.15 146.6,91.78
  Bottom Layer w0.1: v2(147.292,92.15) 147.94,91.5 R10_R14.2@147.958,91.5
TH1_SENSE_R21: C10_R21.1 R10_R21.2 TH1_R21.1 U1_R21.D6 | length 5.6
  Inner2 w0.1: v3(89.449,103.727) 89.596,103.58 89.6,103.58 ; v3(89.5,100.351) 89.5,101.3 89.96,101.76 89.96,102.35 89.6,102.71 89.6,103.58 ; v2(90.292,103.95) 89.97,103.95 89.6,103.58
  Bottom Layer w0.1: v2(90.292,103.95) 90.94,103.3 R10_R21.2@90.958,103.3
TH1_SENSE_R22: C10_R22.1 R10_R22.2 TH1_R22.1 U1_R22.D6 | length 5.6
  Inner2 w0.1: v3(108.449,103.727) 108.596,103.58 108.6,103.58 ; v3@108.5,100.351 108.5,101.3 108.96,101.76 108.96,102.35 108.6,102.71 108.6,103.58 ; v2(109.292,103.95) 108.97,103.95 108.6,103.58
  Bottom Layer w0.1: v2(109.292,103.95) 109.94,103.3 R10_R22.2@109.958,103.3
  other v3: 108.5,100.351
TH1_SENSE_R23: C10_R23.1 R10_R23.2 TH1_R23.1 U1_R23.D6 | length 5.6
  Inner2 w0.1: v3(127.449,103.727) 127.596,103.58 127.6,103.58 ; v3(127.5,100.351) 127.5,101.3 127.96,101.76 127.96,102.35 127.6,102.71 127.6,103.58 ; v2(128.292,103.95) 127.97,103.95 127.6,103.58
  Bottom Layer w0.1: v2(128.292,103.95) 128.94,103.3 R10_R23.2@128.958,103.3
TH1_SENSE_R24: C10_R24.1 R10_R24.2 TH1_R24.1 U1_R24.D6 | length 5.6
  Inner2 w0.1: v3(146.449,103.727) 146.596,103.58 146.6,103.58 ; v3(146.5,100.351) 146.5,101.3 146.96,101.76 146.96,102.35 146.6,102.71 146.6,103.58 ; v2(147.292,103.95) 146.97,103.95 146.6,103.58
  Bottom Layer w0.1: v2(147.292,103.95) 147.94,103.3 R10_R24.2@147.958,103.3
TH1_SENSE_R31: C10_R31.1 R10_R31.2 TH1_R31.1 U1_R31.D6 | length 5.6
  Inner2 w0.1: v3(89.449,115.527) 89.596,115.38 89.6,115.38 ; v3(89.5,112.151) 89.5,113.1 89.96,113.56 89.96,114.15 89.6,114.51 89.6,115.38 ; v2(90.292,115.75) 89.97,115.75 89.6,115.38
  Bottom Layer w0.1: v2(90.292,115.75) 90.94,115.1 R10_R31.2@90.958,115.1
TH1_SENSE_R32: C10_R32.1 R10_R32.2 TH1_R32.1 U1_R32.D6 | length 5.6
  Inner2 w0.1: v3(108.449,115.527) 108.596,115.38 108.6,115.38 ; v3@108.5,112.151 108.5,113.1 108.96,113.56 108.96,114.15 108.6,114.51 108.6,115.38 ; v2(109.292,115.75) 108.97,115.75 108.6,115.38
  Bottom Layer w0.1: v2(109.292,115.75) 109.94,115.1 R10_R32.2@109.958,115.1
  other v3: 108.5,112.151
TH1_SENSE_R33: C10_R33.1 R10_R33.2 TH1_R33.1 U1_R33.D6 | length 5.6
  Inner2 w0.1: v3(127.449,115.527) 127.596,115.38 127.6,115.38 ; v3(127.5,112.151) 127.5,113.1 127.96,113.56 127.96,114.15 127.6,114.51 127.6,115.38 ; v2(128.292,115.75) 127.97,115.75 127.6,115.38
  Bottom Layer w0.1: v2(128.292,115.75) 128.94,115.1 R10_R33.2@128.958,115.1
TH1_SENSE_R34: C10_R34.1 R10_R34.2 TH1_R34.1 U1_R34.D6 | length 5.6
  Inner2 w0.1: v3(146.449,115.527) 146.596,115.38 146.6,115.38 ; v3(146.5,112.151) 146.5,113.1 146.96,113.56 146.96,114.15 146.6,114.51 146.6,115.38 ; v2(147.292,115.75) 146.97,115.75 146.6,115.38
  Bottom Layer w0.1: v2(147.292,115.75) 147.94,115.1 R10_R34.2@147.958,115.1
TH1_SENSE_R41: C10_R41.1 R10_R41.2 TH1_R41.1 U1_R41.D6 | length 5.6
  Inner2 w0.1: v3(89.449,127.327) 89.596,127.18 89.6,127.18 ; v3(89.5,123.951) 89.5,124.9 89.96,125.36 89.96,125.95 89.6,126.31 89.6,127.18 ; v2(90.292,127.55) 89.97,127.55 89.6,127.18
  Bottom Layer w0.1: v2(90.292,127.55) 90.94,126.9 R10_R41.2@90.958,126.9
TH1_SENSE_R42: C10_R42.1 R10_R42.2 TH1_R42.1 U1_R42.D6 | length 5.6
  Inner2 w0.1: v3(108.449,127.327) 108.596,127.18 108.6,127.18 ; v3@108.5,123.951 108.5,124.9 108.96,125.36 108.96,125.95 108.6,126.31 108.6,127.18 ; v2(109.292,127.55) 108.97,127.55 108.6,127.18
  Bottom Layer w0.1: v2(109.292,127.55) 109.94,126.9 R10_R42.2@109.958,126.9
  other v3: 108.5,123.951
TH1_SENSE_R43: C10_R43.1 R10_R43.2 TH1_R43.1 U1_R43.D6 | length 5.6
  Inner2 w0.1: v3(127.449,127.327) 127.596,127.18 127.6,127.18 ; v3(127.5,123.951) 127.5,124.9 127.96,125.36 127.96,125.95 127.6,126.31 127.6,127.18 ; v2(128.292,127.55) 127.97,127.55 127.6,127.18
  Bottom Layer w0.1: v2(128.292,127.55) 128.94,126.9 R10_R43.2@128.958,126.9
TH1_SENSE_R44: C10_R44.1 R10_R44.2 TH1_R44.1 U1_R44.D6 | length 5.6
  Inner2 w0.1: v3(146.449,127.327) 146.596,127.18 146.6,127.18 ; v3(146.5,123.951) 146.5,124.9 146.96,125.36 146.96,125.95 146.6,126.31 146.6,127.18 ; v2(147.292,127.55) 146.97,127.55 146.6,127.18
  Bottom Layer w0.1: v2(147.292,127.55) 147.94,126.9 R10_R44.2@147.958,126.9
TH1_SENSE_R51: C10_R51.1 R10_R51.2 TH1_R51.1 U1_R51.D6 | length 5.6
  Inner2 w0.1: v3(89.449,139.127) 89.596,138.98 89.6,138.98 ; v3(89.5,135.751) 89.5,136.7 89.96,137.16 89.96,137.75 89.6,138.11 89.6,138.98 ; v2(90.292,139.35) 89.97,139.35 89.6,138.98
  Bottom Layer w0.1: v2(90.292,139.35) 90.94,138.7 R10_R51.2@90.958,138.7
TH1_SENSE_R52: C10_R52.1 R10_R52.2 TH1_R52.1 U1_R52.D6 | length 5.6
  Inner2 w0.1: v3(108.449,139.127) 108.596,138.98 108.6,138.98 ; v3@108.5,135.751 108.5,136.7 108.96,137.16 108.96,137.75 108.6,138.11 108.6,138.98 ; v2(109.292,139.35) 108.97,139.35 108.6,138.98
  Bottom Layer w0.1: v2(109.292,139.35) 109.94,138.7 R10_R52.2@109.958,138.7
  other v3: 108.5,135.751
TH1_SENSE_R53: C10_R53.1 R10_R53.2 TH1_R53.1 U1_R53.D6 | length 5.6
  Inner2 w0.1: v3(127.449,139.127) 127.596,138.98 127.6,138.98 ; v3(127.5,135.751) 127.5,136.7 127.96,137.16 127.96,137.75 127.6,138.11 127.6,138.98 ; v2(128.292,139.35) 127.97,139.35 127.6,138.98
  Bottom Layer w0.1: v2(128.292,139.35) 128.94,138.7 R10_R53.2@128.958,138.7
TH1_SENSE_R54: C10_R54.1 R10_R54.2 TH1_R54.1 U1_R54.D6 | length 5.6
  Inner2 w0.1: v3(146.449,139.127) 146.596,138.98 146.6,138.98 ; v3(146.5,135.751) 146.5,136.7 146.96,137.16 146.96,137.75 146.6,138.11 146.6,138.98 ; v2(147.292,139.35) 146.97,139.35 146.6,138.98
  Bottom Layer w0.1: v2(147.292,139.35) 147.94,138.7 R10_R54.2@147.958,138.7
TH4_SENSE_R11: R11_R11.2 TH4_R11.1 U1_R11.C6 | length 6.6
  Top Layer w0.1: v4(92.735,90.7) 92.751,90.71 TH4_R11.1@92.751,91.119
  Inner3 w0.1: v3(89.5,88.15) 91.75,88.15 v2(92.1,87.76)
  Bottom Layer w0.1: v2(92.1,87.76) 92.1,90.4 92.4,90.7 v4(92.735,90.7)
TH4_SENSE_R12: R11_R12.2 TH4_R12.1 U1_R12.C6 | length 6.6
  Top Layer w0.1: v4(111.735,90.7) 111.751,90.71 TH4_R12.1@111.751,91.119
  Inner3 w0.1: v3(108.5,88.15) 110.75,88.15 v2(111.1,87.76)
  Bottom Layer w0.1: v2(111.1,87.76) 111.1,90.4 111.4,90.7 v4(111.735,90.7)
TH4_SENSE_R13: R11_R13.2 TH4_R13.1 U1_R13.C6 | length 6.6
  Top Layer w0.1: v4(130.735,90.7) 130.751,90.71 TH4_R13.1@130.751,91.119
  Inner3 w0.1: v3(127.5,88.15) 129.75,88.15 v2(130.1,87.76)
  Bottom Layer w0.1: v2(130.1,87.76) 130.1,90.4 130.4,90.7 v4(130.735,90.7)
TH4_SENSE_R14: R11_R14.2 TH4_R14.1 U1_R14.C6 | length 6.6
  Top Layer w0.1: v4(149.735,90.7) 149.751,90.71 TH4_R14.1@149.751,91.119
  Inner3 w0.1: v3(146.5,88.15) 148.75,88.15 v2(149.1,87.76)
  Bottom Layer w0.1: v2(149.1,87.76) 149.1,90.4 149.4,90.7 v4(149.735,90.7)
TH4_SENSE_R21: R11_R21.2 TH4_R21.1 U1_R21.C6 | length 6.6
  Top Layer w0.1: v4(92.735,102.5) 92.751,102.51 TH4_R21.1@92.75,102.918
  Inner3 w0.1: v3(89.5,99.95) 91.75,99.95 v2(92.1,99.56)
  Bottom Layer w0.1: v2(92.1,99.56) 92.1,102.2 92.4,102.5 v4(92.735,102.5)
TH4_SENSE_R22: R11_R22.2 TH4_R22.1 U1_R22.C6 | length 6.6
  Top Layer w0.1: v4(111.735,102.5) 111.751,102.51 TH4_R22.1@111.75,102.918
  Inner3 w0.1: v3(108.5,99.95) 110.75,99.95 v2(111.1,99.56)
  Bottom Layer w0.1: v2(111.1,99.56) 111.1,102.2 111.4,102.5 v4(111.735,102.5)
TH4_SENSE_R23: R11_R23.2 TH4_R23.1 U1_R23.C6 | length 6.6
  Top Layer w0.1: v4(130.735,102.5) 130.751,102.51 TH4_R23.1@130.751,102.919
  Inner3 w0.1: v3(127.5,99.95) 129.75,99.95 v2(130.1,99.56)
  Bottom Layer w0.1: v2(130.1,99.56) 130.1,102.2 130.4,102.5 v4(130.735,102.5)
TH4_SENSE_R24: R11_R24.2 TH4_R24.1 U1_R24.C6 | length 6.6
  Top Layer w0.1: v4(149.735,102.5) 149.751,102.51 TH4_R24.1@149.75,102.918
  Inner3 w0.1: v3(146.5,99.95) 148.75,99.95 v2(149.1,99.56)
  Bottom Layer w0.1: v2(149.1,99.56) 149.1,102.2 149.4,102.5 v4(149.735,102.5)
TH4_SENSE_R31: R11_R31.2 TH4_R31.1 U1_R31.C6 | length 6.6
  Top Layer w0.1: v4(92.735,114.3) 92.751,114.31 TH4_R31.1@92.75,114.718
  Inner3 w0.1: v3(89.5,111.75) 91.75,111.75 v2(92.1,111.36)
  Bottom Layer w0.1: v2(92.1,111.36) 92.1,114 92.4,114.3 v4(92.735,114.3)
TH4_SENSE_R32: R11_R32.2 TH4_R32.1 U1_R32.C6 | length 6.6
  Top Layer w0.1: v4(111.735,114.3) 111.751,114.31 TH4_R32.1@111.75,114.718
  Inner3 w0.1: v3(108.5,111.75) 110.75,111.75 v2(111.1,111.36)
  Bottom Layer w0.1: v2(111.1,111.36) 111.1,114 111.4,114.3 v4(111.735,114.3)
TH4_SENSE_R33: R11_R33.2 TH4_R33.1 U1_R33.C6 | length 6.6
  Top Layer w0.1: v4(130.735,114.3) 130.751,114.31 TH4_R33.1@130.751,114.719
  Inner3 w0.1: v3(127.5,111.75) 129.75,111.75 v2(130.1,111.36)
  Bottom Layer w0.1: v2(130.1,111.36) 130.1,114 130.4,114.3 v4(130.735,114.3)